# Altium PCB PWR Board 10A.PcbDoc (part 2 of 10)
Units mm, origin at the board's own origin, x right, y up, seen from the top; angles counter-clockwise.
Board outline 355 x 325 mm, 4 copper layers (Top Layer, Layer 1, Layer 2, Bottom Layer), stack 1.636 mm thick; 617 components, 308 nets, 1518 pads, 1199 vias.
Unrouted connection lines stored in the file: 361.
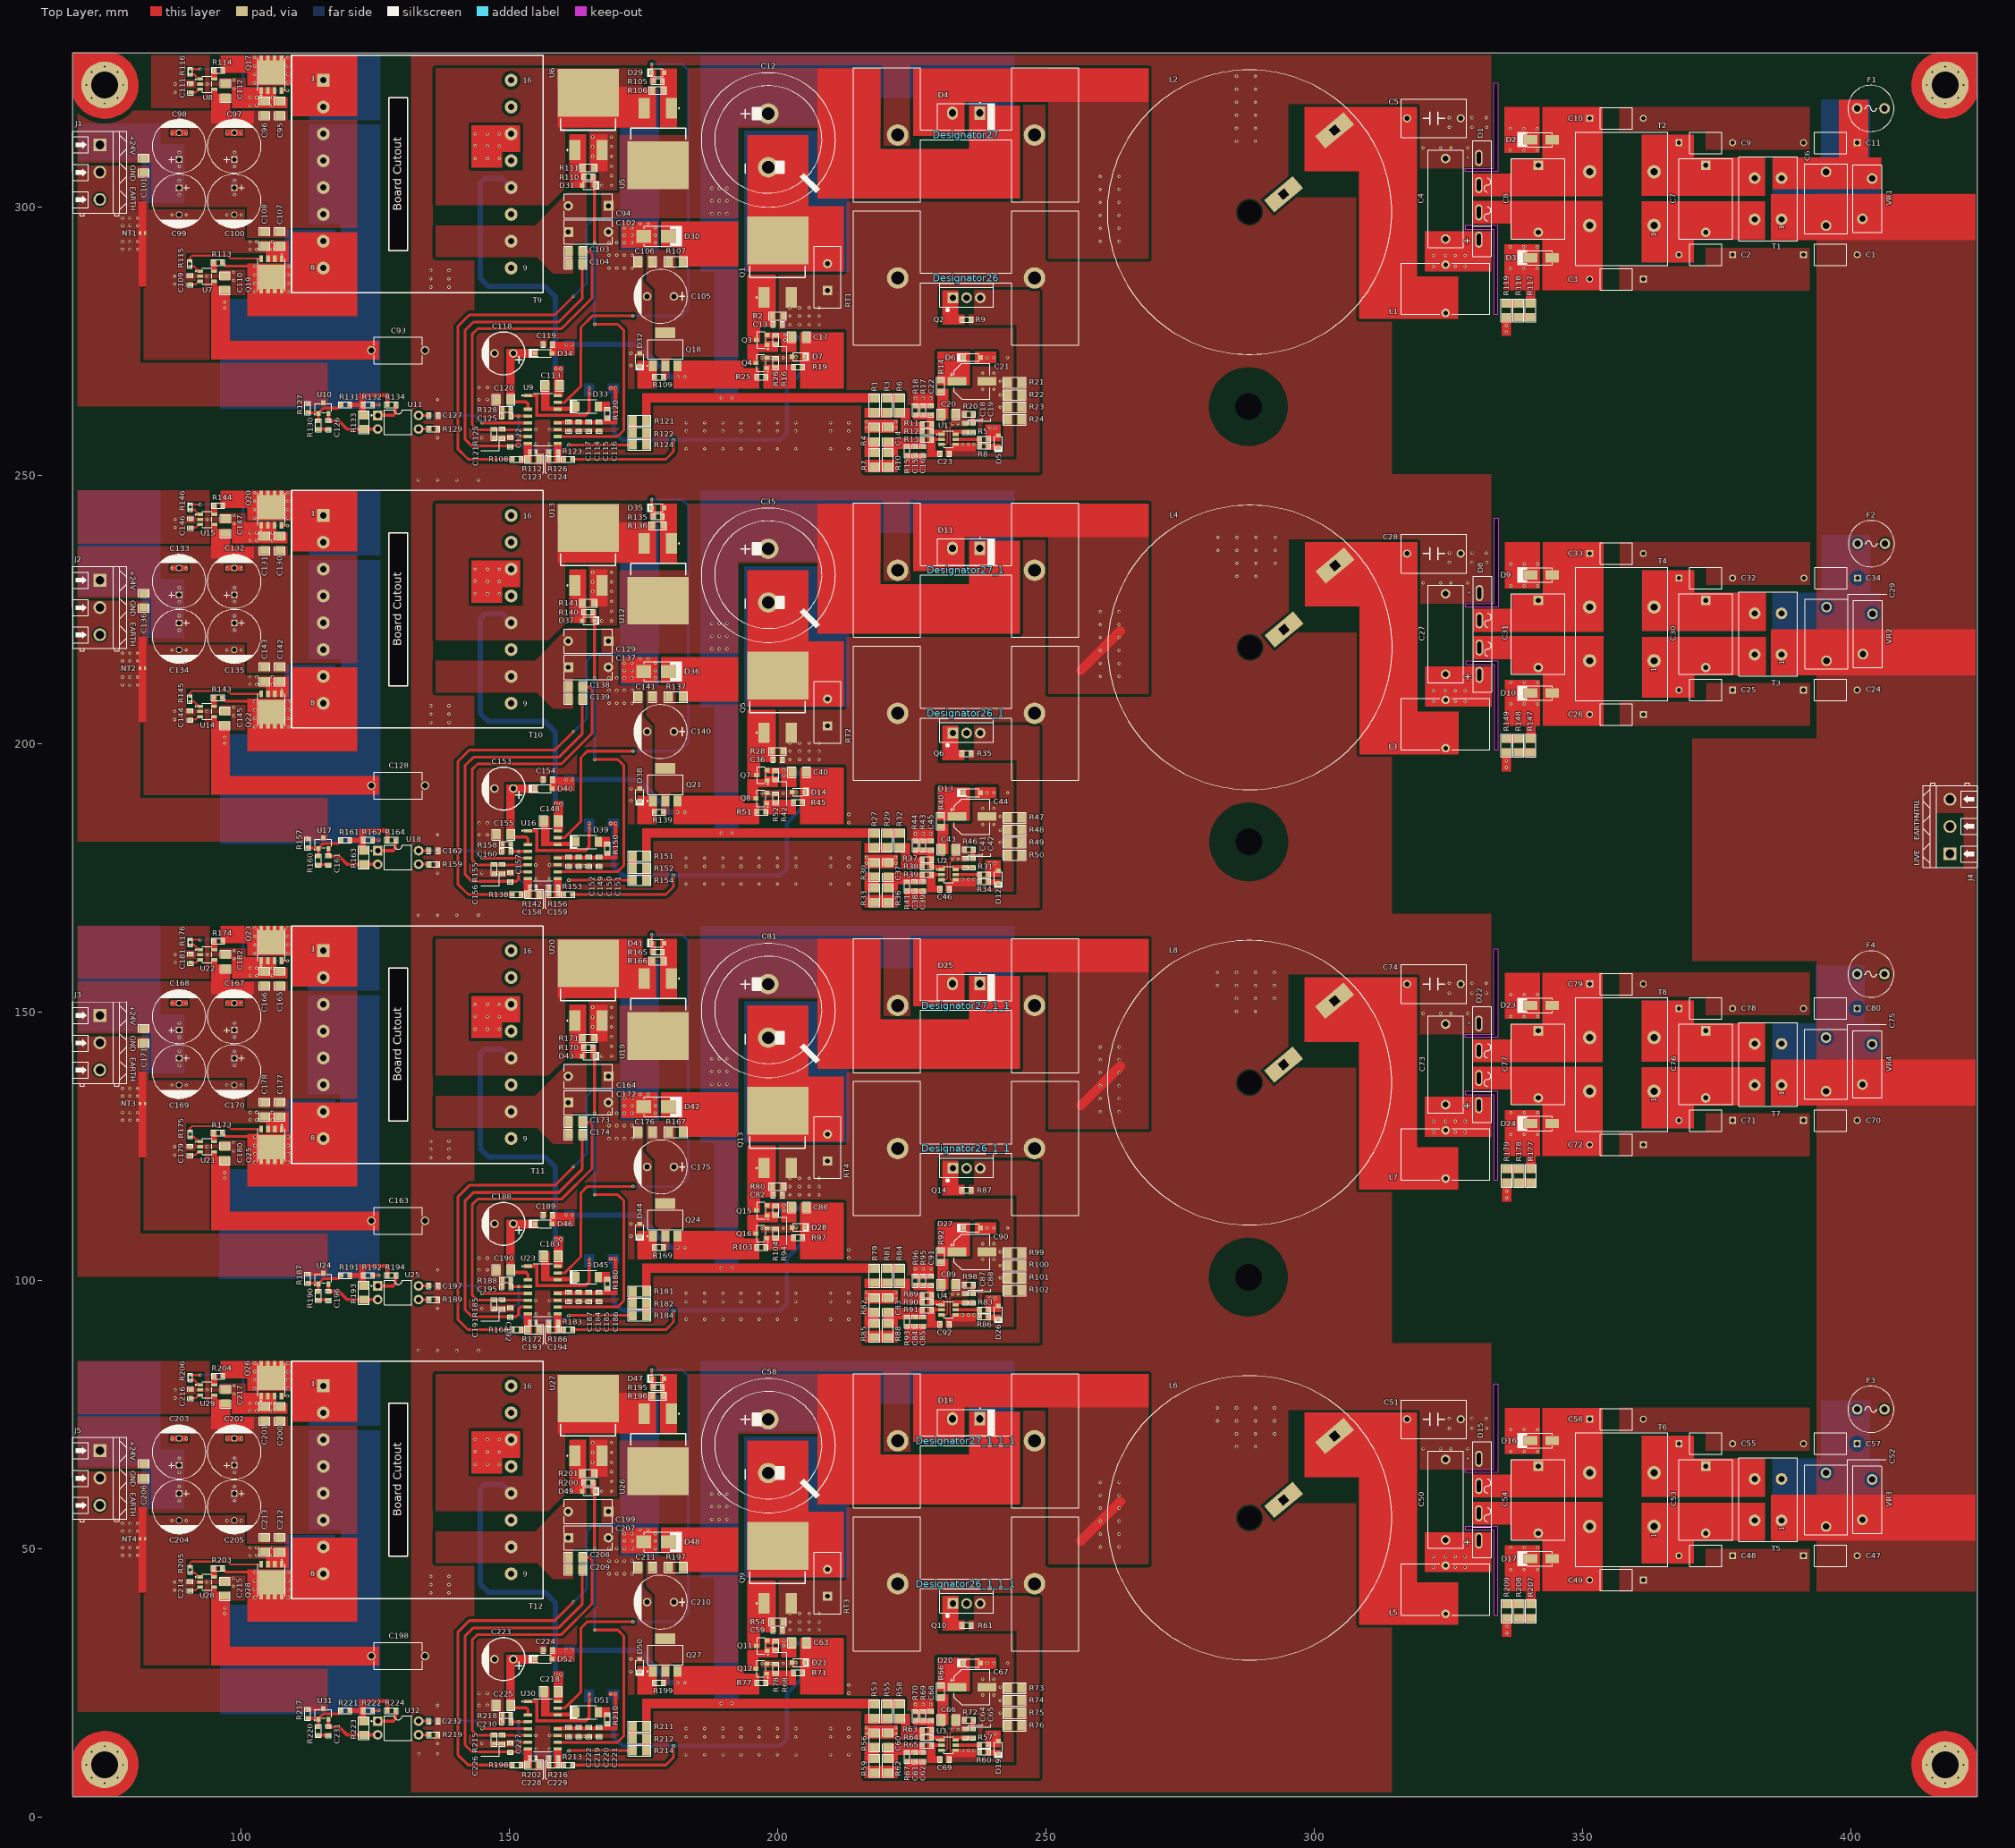
[diagram p0: Top Layer view]

## Part data (continued)
C7 C8 C30 C31 C53 C54 C76 C77: library part 890324024005, "CAP FILM 0.47UF 10% 275VAC RAD", Manufacturer="Wurth Electronics", Supplier Part Number=732-5890-ND, ComponentLink1Description=http://www.farnell.com/datasheets/1867975.pdf?src-supplier=Farnell, ComponentLink1URL=http://www.farnell.com/datasheets/1867975.pdf?src-supplier=Farnell, ComponentLink2Description=http://www.farnell.com/datasheets/1867975.pdf?src-supplier=Element14, ComponentLink2URL=http://www.farnell.com/datasheets/1867975.pdf?src-supplier=Element14, ComponentLink3Description=https://katalog.we-online.de/pbs/datasheet/890324024005.pdf?src-supplier=Digikey, ComponentLink3URL=https://katalog.we-online.de/pbs/datasheet/890324024005.pdf?src-supplier=Digikey, ComponentLink4Description=http://www.farnell.com/datasheets/1867975.pdf?src-supplier=Newark, ComponentLink4URL=http://www.farnell.com/datasheets/1867975.pdf?src-supplier=Newark, Item Type=Capacitor, Manufacturer Part Number=890324024005, Pricing="1=0.75, 50=0.645, 100=0.574, 250=0.501, 500=0.454, 1000=0.418 (USD)", RoHS=Yes, Stock=13537, Supplier=Digikey
C12 C35 C58 C81: library part KN151M45025*30A, "20% 900mA@120Hz 10mm 450V 150uF Plugin,D25xL30mm Horn-Type Electrolytic Capacitors ROHS", LCSC Part Number=C513373, Manufacturer=KFSON, Package=Plugin,D25xL30mm, ComponentLink1Description=LCSC, ComponentLink1URL=https://www.lcsc.com/product-detail/Horn-Type-Electrolytic-Capacitors_KFSON-KN151M45025-30A_C513373.html, Item Type=Capacitor, Manufacturer Part Number=KN151M45025*30A
C13 C36 C59 C82: library part CL10B104KB8WPNC, "CAP CER 0.1UF 50V X7R 0603", Case Code (Imperial)=0603, Case Code (Metric)=1608, LCSC Part Number=C307348, Max Operating Temperature=125°C, Min Operating Temperature=-55°C, Ratings=AEC-Q200, Supplier Part Number=2575919, Tolerance=10%, Voltage Rating=50V, Case/Package=0603, Category="Ceramic Capacitors", ComponentLink1Description=LCSC, ComponentLink2Description=http://www.farnell.com/datasheets/2710560.pdf?src-supplier=Farnell, ComponentLink2URL=http://www.farnell.com/datasheets/2710560.pdf?src-supplier=Farnell, ComponentLink3Description=http://www.samsungsem.com/kr/support/product-search/mlcc/CL10B104KB8WPNC.jsp?src-supplier=Digi-Key, ComponentLink3URL=http://www.samsungsem.com/kr/support/product-search/mlcc/CL10B104KB8WPNC.jsp?src-supplier=Digi-Key, ComponentLink4Description=http://www.farnell.com/datasheets/2710560.pdf?src-supplier=Element14, ComponentLink4URL=http://www.farnell.com/datasheets/2710560.pdf?src-supplier=Element14, ComponentLink5Description=https://datasheet.octopart.com/CL10B104KB8WPNC-Samsung-Electro-Mechanics-datasheet-120093645.pdf?src-supplier=Future+Electronics, ComponentLink5URL=https://datasheet.octopart.com/CL10B104KB8WPNC-Samsung-Electro-Mechanics-datasheet-120093645.pdf?src-supplier=Future+Electronics, ComponentLink6Description=http://www.farnell.com/datasheets/2710560.pdf?src-supplier=Newark, ComponentLink6URL=http://www.farnell.com/datasheets/2710560.pdf?src-supplier=Newark, ComponentLink7Description=http://www.samsungsem.com/servlet/FileDownload?type=spec&file=CL10B104KB8WPNC.pdf&src-supplier=Avnet, ComponentLink7URL=http://www.samsungsem.com/servlet/FileDownload?type=spec&file=CL10B104KB8WPNC.pdf&src-supplier=Avnet, ComponentLink8Description=https://datasheet.octopart.com/CL10B104KB8WPNC-Samsung-datasheet-8326407.pdf?src-supplier=TME, ComponentLink8URL=https://datasheet.octopart.com/CL10B104KB8WPNC-Samsung-datasheet-8326407.pdf?src-supplier=TME, Height=900um, Item Type=Capacitor, Lead Free=5697LeadFree, Material=4241ConductorMaterial, Mounting Technology="Surface Mount", Packaging="Cut Tape", Pricing="100=0.021, 500=0.019, 1000=0.015, 2000=0.01 (GBP)", RoHS=Yes, RoHS Compliant=Yes, Series=CL, Stock=400, Supplier=Rs, Voltage Rating (DC)=50V
C14 C37 C60 C83: library part CC1206JKNPOCBN100, "CAP CER 10PF 1KV C0G/NPO 1206", LCSC Part Number=C107172, Manufacturer=Yageo, ComponentLink1Description=https://datasheet.ciiva.com/11494/hv-11494856.pdf?src-supplier=Avnet, ComponentLink1URL=https://datasheet.ciiva.com/11494/hv-11494856.pdf?src-supplier=Avnet, Item Type=Capacitor, Manufacturer Part Number=CC1206JKNPOCBN100, Pricing="3000=0.0222, 9000=0.0214, 15000=0.021, 60000=0.0201, 90000=0.0194 (USD)", RoHS=Yes, Stock=9000, Supplier="Future Electronics"
C15 C38 C61 C84: library part CC0603KRX7R8BB392, "CAP CER 3900PF 25V X7R 0603", Case Code (Imperial)=0603, Case Code (Metric)=1608, Dielectric=X7R, LCSC Part Number=C519424, Manufacturer=Yageo, Max Operating Temperature=125°C, Min Operating Temperature=-55°C, Tolerance=10%, Voltage Rating=25V, Case/Package=0603, ComponentLink1Description=https://datasheet.ciiva.com/13207/upy-gphc-x7r-6-3v-to-50v-8-12304-13207771.pdf?src-supplier=Mouser, ComponentLink1URL=https://datasheet.ciiva.com/13207/upy-gphc-x7r-6-3v-to-50v-8-12304-13207771.pdf?src-supplier=Mouser, Halogen Free="Halogen Free", Height=900um, Item Type=Capacitor, Lead Free="Lead Free", Length=0.063inch, Manufacturer Part Number=CC0603KRX7R8BB392, Material=4241ConductorMaterial, Mounting Technology="Surface Mount", Packaging="Tape and Reel", Pricing="1=0.1, 10=0.061, 50=0.035, 100=0.0271, 500=0.02036, 1000=0.016 (USD)", RoHS=Yes, Series=CC, Stock=46115, Supplier=Digikey, Termination=SMD/SMT, Thickness=0.035inch, Voltage Rating (DC)=25V, Weight=7.1E-05oz, Width=0.031inch
C16 C39 C62 C85: library part 06035A561JAT2A, "CAP CER 560PF 50V C0G/NP0 0603", LCSC Part Number=C597173, Manufacturer="Kyocera AVX", ComponentLink1Description=https://datasheet.ciiva.com/27051/1032160-27051276.pdf?src-supplier=Jameco, ComponentLink1URL=https://datasheet.ciiva.com/27051/1032160-27051276.pdf?src-supplier=Jameco, ComponentLink2Description=https://datasheet.ciiva.com/16286/ccog-16286446.pdf?src-supplier=Future+Electronics, ComponentLink2URL=https://datasheet.ciiva.com/16286/ccog-16286446.pdf?src-supplier=Future+Electronics, ComponentLink3Description=https://datasheet.ciiva.com/150/ccog-150647.pdf?src-supplier=Digikey, ComponentLink3URL=https://datasheet.ciiva.com/150/ccog-150647.pdf?src-supplier=Digikey, ComponentLink4Description=https://datasheet.ciiva.com/150/ccog-150648.pdf?src-supplier=Digikey, ComponentLink4URL=https://datasheet.ciiva.com/150/ccog-150648.pdf?src-supplier=Digikey, ComponentLink5Description=https://datasheet.ciiva.com/150/ccog-150649.pdf?src-supplier=Digikey, ComponentLink5URL=https://datasheet.ciiva.com/150/ccog-150649.pdf?src-supplier=Digikey, ComponentLink6Description=https://datasheet.ciiva.com/2987/ccog-2987809.pdf?src-supplier=Avnet, ComponentLink6URL=https://datasheet.ciiva.com/2987/ccog-2987809.pdf?src-supplier=Avnet, ComponentLink7Description=https://datasheet.ciiva.com/2987/ccog-2987810.pdf?src-supplier=Avnet, ComponentLink7URL=https://datasheet.ciiva.com/2987/ccog-2987810.pdf?src-supplier=Avnet, ComponentLink8Description=https://datasheet.ciiva.com/5423/ccog-5423589.pdf?src-supplier=Mouser, ComponentLink8URL=https://datasheet.ciiva.com/5423/ccog-5423589.pdf?src-supplier=Mouser, ComponentLink9Description=https://datasheet.ciiva.com/14598/70001039-14598549.pdf?src-supplier=Allied+Electronics, ComponentLink9URL=https://datasheet.ciiva.com/14598/70001039-14598549.pdf?src-supplier=Allied+Electronics, ComponentLink10Description=https://datasheet.ciiva.com/1124/425357-1124836.pdf?src-supplier=Element14, ComponentLink10URL=https://datasheet.ciiva.com/1124/425357-1124836.pdf?src-supplier=Element14, ComponentLink11Description=https://datasheet.ciiva.com/1124/425357-1124837.pdf?src-supplier=Element14, ComponentLink11URL=https://datasheet.ciiva.com/1124/425357-1124837.pdf?src-supplier=Element14, Item Type=Capacitor, Manufacturer Part Number=06035A561JAT2A, Pricing="4000=0.0172, 16000=0.0165, 40000=0.0091, 60000=0.0158, 100000=0.0088, 120000=0.0155, 160000=0.0083, 300000=0.0148 (USD)", RoHS=Yes, Stock=180000, Supplier="Future Electronics"
C17 C40 C63 C86: library part 12063C474KAT2A, "CAP CER 0.47UF 25V X7R 1206", LCSC Part Number=C5128353, Manufacturer="Kyocera AVX", ComponentLink1Description=https://datasheet.ciiva.com/11788/0900766b80dc2409-11788602.pdf?src-supplier=Rs, ComponentLink1URL=https://datasheet.ciiva.com/11788/0900766b80dc2409-11788602.pdf?src-supplier=Rs, ComponentLink2Description=https://datasheet.ciiva.com/19476/2014158-19476160.pdf?src-supplier=Jameco, ComponentLink2URL=https://datasheet.ciiva.com/19476/2014158-19476160.pdf?src-supplier=Jameco, ComponentLink3Description=https://datasheet.ciiva.com/14601/70001075-14601957.pdf?src-supplier=Allied+Electronics, ComponentLink3URL=https://datasheet.ciiva.com/14601/70001075-14601957.pdf?src-supplier=Allied+Electronics, ComponentLink4Description=https://datasheet.ciiva.com/28546/683218-28546839.pdf?src-supplier=Element14, ComponentLink4URL=https://datasheet.ciiva.com/28546/683218-28546839.pdf?src-supplier=Element14, ComponentLink5Description=https://datasheet.ciiva.com/7833/84526-7833365.pdf?src-supplier=Element14, ComponentLink5URL=https://datasheet.ciiva.com/7833/84526-7833365.pdf?src-supplier=Element14, ComponentLink6Description=https://datasheet.ciiva.com/16291/cx7r-16291039.pdf?src-supplier=Future+Electronics, ComponentLink6URL=https://datasheet.ciiva.com/16291/cx7r-16291039.pdf?src-supplier=Future+Electronics, ComponentLink7Description=https://datasheet.ciiva.com/152/cx7r-152592.pdf?src-supplier=Digikey, ComponentLink7URL=https://datasheet.ciiva.com/152/cx7r-152592.pdf?src-supplier=Digikey, ComponentLink8Description=https://datasheet.ciiva.com/152/cx7r-152593.pdf?src-supplier=Digikey, ComponentLink8URL=https://datasheet.ciiva.com/152/cx7r-152593.pdf?src-supplier=Digikey, ComponentLink9Description=https://datasheet.ciiva.com/152/cx7r-152594.pdf?src-supplier=Digikey, ComponentLink9URL=https://datasheet.ciiva.com/152/cx7r-152594.pdf?src-supplier=Digikey, Item Type=Capacitor, Manufacturer Part Number=12063C474KAT2A, Pricing="2000=0.0614, 6000=0.0591, 10000=0.0566, 20000=0.0567, 40000=0.0554, 80000=0.053 (USD)", RoHS=Yes, Stock=38000, Supplier="Future Electronics"
C18 C41 C64 C87: library part CC0603KRX7R9BB683, "CAP CER 0.068UF 50V X7R 0603", Case Code (Imperial)=0603, Case Code (Metric)=1608, Dielectric=X7R, LCSC Part Number=C107098, Manufacturer=Yageo, Max Operating Temperature=125°C, Min Operating Temperature=-55°C, Supplier Part Number=3015344, Tolerance=10%, Voltage Rating=50V, Case/Package=0603, ComponentLink1Description=http://www.mouser.com/ds/2/447/Yageo_UPY-GP_NP0_16V-to-50V_9-358835.pdf?src-supplier=Mouser, ComponentLink1URL=http://www.mouser.com/ds/2/447/Yageo_UPY-GP_NP0_16V-to-50V_9-358835.pdf?src-supplier=Mouser, ComponentLink2Description=https://datasheet.octopart.com/CC0603KRX7R9BB683-Yageo-datasheet-166511530.pdf?src-supplier=Future+Electronics, ComponentLink2URL=https://datasheet.octopart.com/CC0603KRX7R9BB683-Yageo-datasheet-166511530.pdf?src-supplier=Future+Electronics, ComponentLink3Description=http://www.yageo.com/documents/recent/UPY-GPHC_X7R_6.3V-to-50V_18.pdf?src-supplier=Digikey, ComponentLink3URL=http://www.yageo.com/documents/recent/UPY-GPHC_X7R_6.3V-to-50V_18.pdf?src-supplier=Digikey, ComponentLink4Description=https://www.yageo.com/upload/media/product/productsearch/datasheet/mlcc/UPY-GPHC_X7R_6.3V-to-50V_18.pdf?src-supplier=Digikey, ComponentLink4URL=https://www.yageo.com/upload/media/product/productsearch/datasheet/mlcc/UPY-GPHC_X7R_6.3V-to-50V_18.pdf?src-supplier=Digikey, ComponentLink5Description=https://datasheet.octopart.com/CC0603KRX7R9BB683-Yageo-datasheet-140260305.pdf?src-supplier=Newark, ComponentLink5URL=https://datasheet.octopart.com/CC0603KRX7R9BB683-Yageo-datasheet-140260305.pdf?src-supplier=Newark, ComponentLink6Description=http://www.yageo.com/documents/recent/UPY-GPHC_X7R_6.3V-to-50V_9.pdf?src-supplier=Future+Electronics, ComponentLink6URL=http://www.yageo.com/documents/recent/UPY-GPHC_X7R_6.3V-to-50V_9.pdf?src-supplier=Future+Electronics, Halogen Free="Halogen Free", Item Type=Capacitors, Lead Free="Lead Free", Length=0.063inch, Manufacturer Part Number=CC0603KRX7R9BB683, Material=4241ConductorMaterial, Mounting Technology="Surface Mount", Packaging="Tape and Reel", Pricing="4000=0.0058, 16000=0.0055, 60000=0.0052, 160000=0.005, 400000=0.0047 (USD)", RoHS=Yes, RoHS Compliant=Yes, Series=CC, Stock=52000, Supplier="Future Electronics", Termination=SMD/SMT, Thickness=0.035inch, Voltage Rating (DC)=50V, Weight=7.1E-05oz, Width=0.031inch
C19 C42 C65 C88: library part CC0603KRX7R7BB224, "CAP CER 0.22UF 16V X7R 0603", Manufacturer=Yageo, Supplier Part Number=311-1426-1-ND, Voltage Rating (DC)=16V, ComponentLink1Description=https://datasheet.ciiva.com/11788/0900766b80d84f1d-11788400.pdf?src-supplier=Rs, ComponentLink1URL=https://datasheet.ciiva.com/11788/0900766b80d84f1d-11788400.pdf?src-supplier=Rs, ComponentLink2Description=https://datasheet.ciiva.com/176/mlccorderingcode-176606.pdf?src-supplier=Digikey, ComponentLink2URL=https://datasheet.ciiva.com/176/mlccorderingcode-176606.pdf?src-supplier=Digikey, ComponentLink3Description=https://datasheet.ciiva.com/176/mlccorderingcode-176607.pdf?src-supplier=Digikey, ComponentLink3URL=https://datasheet.ciiva.com/176/mlccorderingcode-176607.pdf?src-supplier=Digikey, ComponentLink4Description=https://datasheet.ciiva.com/176/mlccorderingcode-176608.pdf?src-supplier=Digikey, ComponentLink4URL=https://datasheet.ciiva.com/176/mlccorderingcode-176608.pdf?src-supplier=Digikey, Halogen Free=5694HalogenFree, Item Type=Capacitor, Lead Free=5697LeadFree, Manufacturer Part Number=CC0603KRX7R7BB224, Material=4241ConductorMaterial, Pricing="1=0.1, 10=0.058, 50=0.0334, 100=0.0258, 500=0.01944, 1000=0.01528 (USD)", RoHS=Yes, Stock=45192, Supplier=Digikey
C20 C43 C66 C89: library part CC1206KKX7R9BB474, "CAP CER 0.47UF 50V X7R 1206", LCSC Part Number=C277483, Manufacturer=Yageo, ComponentLink1Description=https://datasheet.ciiva.com/13210/upy-gp-np0-16v-to-50v-8-13210236.pdf?src-supplier=Mouser, ComponentLink1URL=https://datasheet.ciiva.com/13210/upy-gp-np0-16v-to-50v-8-13210236.pdf?src-supplier=Mouser, ComponentLink2Description=https://datasheet.ciiva.com/181/mlccorderingcode-181013.pdf?src-supplier=Digikey, ComponentLink2URL=https://datasheet.ciiva.com/181/mlccorderingcode-181013.pdf?src-supplier=Digikey, ComponentLink3Description=https://datasheet.ciiva.com/181/mlccorderingcode-181014.pdf?src-supplier=Digikey, ComponentLink3URL=https://datasheet.ciiva.com/181/mlccorderingcode-181014.pdf?src-supplier=Digikey, ComponentLink4Description=https://datasheet.ciiva.com/181/mlccorderingcode-181015.pdf?src-supplier=Digikey, ComponentLink4URL=https://datasheet.ciiva.com/181/mlccorderingcode-181015.pdf?src-supplier=Digikey, Item Type=Capacitor, Manufacturer Part Number=CC1206KKX7R9BB474, Material=4241ConductorMaterial, Pricing="3000=0.0393, 9000=0.0378, 15000=0.0371, 30000=0.0362, 60000=0.0349 (USD)", RoHS=Yes, Stock=36000, Supplier="Future Electronics"
C21 C44 C67 C90: library part 50SVPF10M, "CAP ALUM POLY 10UF 20% 50V SMD", LCSC Part Number=C2162323, Manufacturer=Panasonic, Supplier Part Number=667-50SVPF10M, Category="Polymer Capacitors", ComponentLink1Description=https://datasheet.ciiva.com/48542/svpf-eng-ds-48542427.pdf?src-supplier=Distrelec, ComponentLink1URL=https://datasheet.ciiva.com/48542/svpf-eng-ds-48542427.pdf?src-supplier=Distrelec, ComponentLink2Description=https://datasheet.ciiva.com/24216/svpf-os-262415-24216043.pdf?src-supplier=Mouser, ComponentLink2URL=https://datasheet.ciiva.com/24216/svpf-os-262415-24216043.pdf?src-supplier=Mouser, ComponentLink3Description=https://datasheet.ciiva.com/25761/1734360-25761263.pdf?src-supplier=Farnell, ComponentLink3URL=https://datasheet.ciiva.com/25761/1734360-25761263.pdf?src-supplier=Farnell, Item Type=Capacitor, Manufacturer Part Number=50SVPF10M, Material=4242ConductorMaterial, Pricing="1=1.12, 10=0.801, 50=0.801, 100=0.665, 1000=0.555, 10000=0.504 (USD)", RoHS=Yes, Stock=29802, Supplier=Mouser